# Altium PCB MainBoardPCB_PWR.PcbDoc (part 29 of 29)
Units mm, origin at the board's own origin, x right, y up, seen from the top; angles counter-clockwise.
Board outline 333.63 x 349.38 mm, 16 copper layers (L1, L2 (GND), L3 (Sign), L4 (GND), L5 (Sign), L6 (PWR/GND), L7(PWR/GND), L8 (PWR/GND), L9 (PWR/GND), L10 (PWR/GND), L11 (PWR/GND), L12 (Sign), L13 (GND), L14 (Sign), L15 (GND), L16), stack 2.503 mm thick; 2187 components, 1615 nets, 7987 pads, 1695 vias.
Unrouted connection lines stored in the file: 4757.
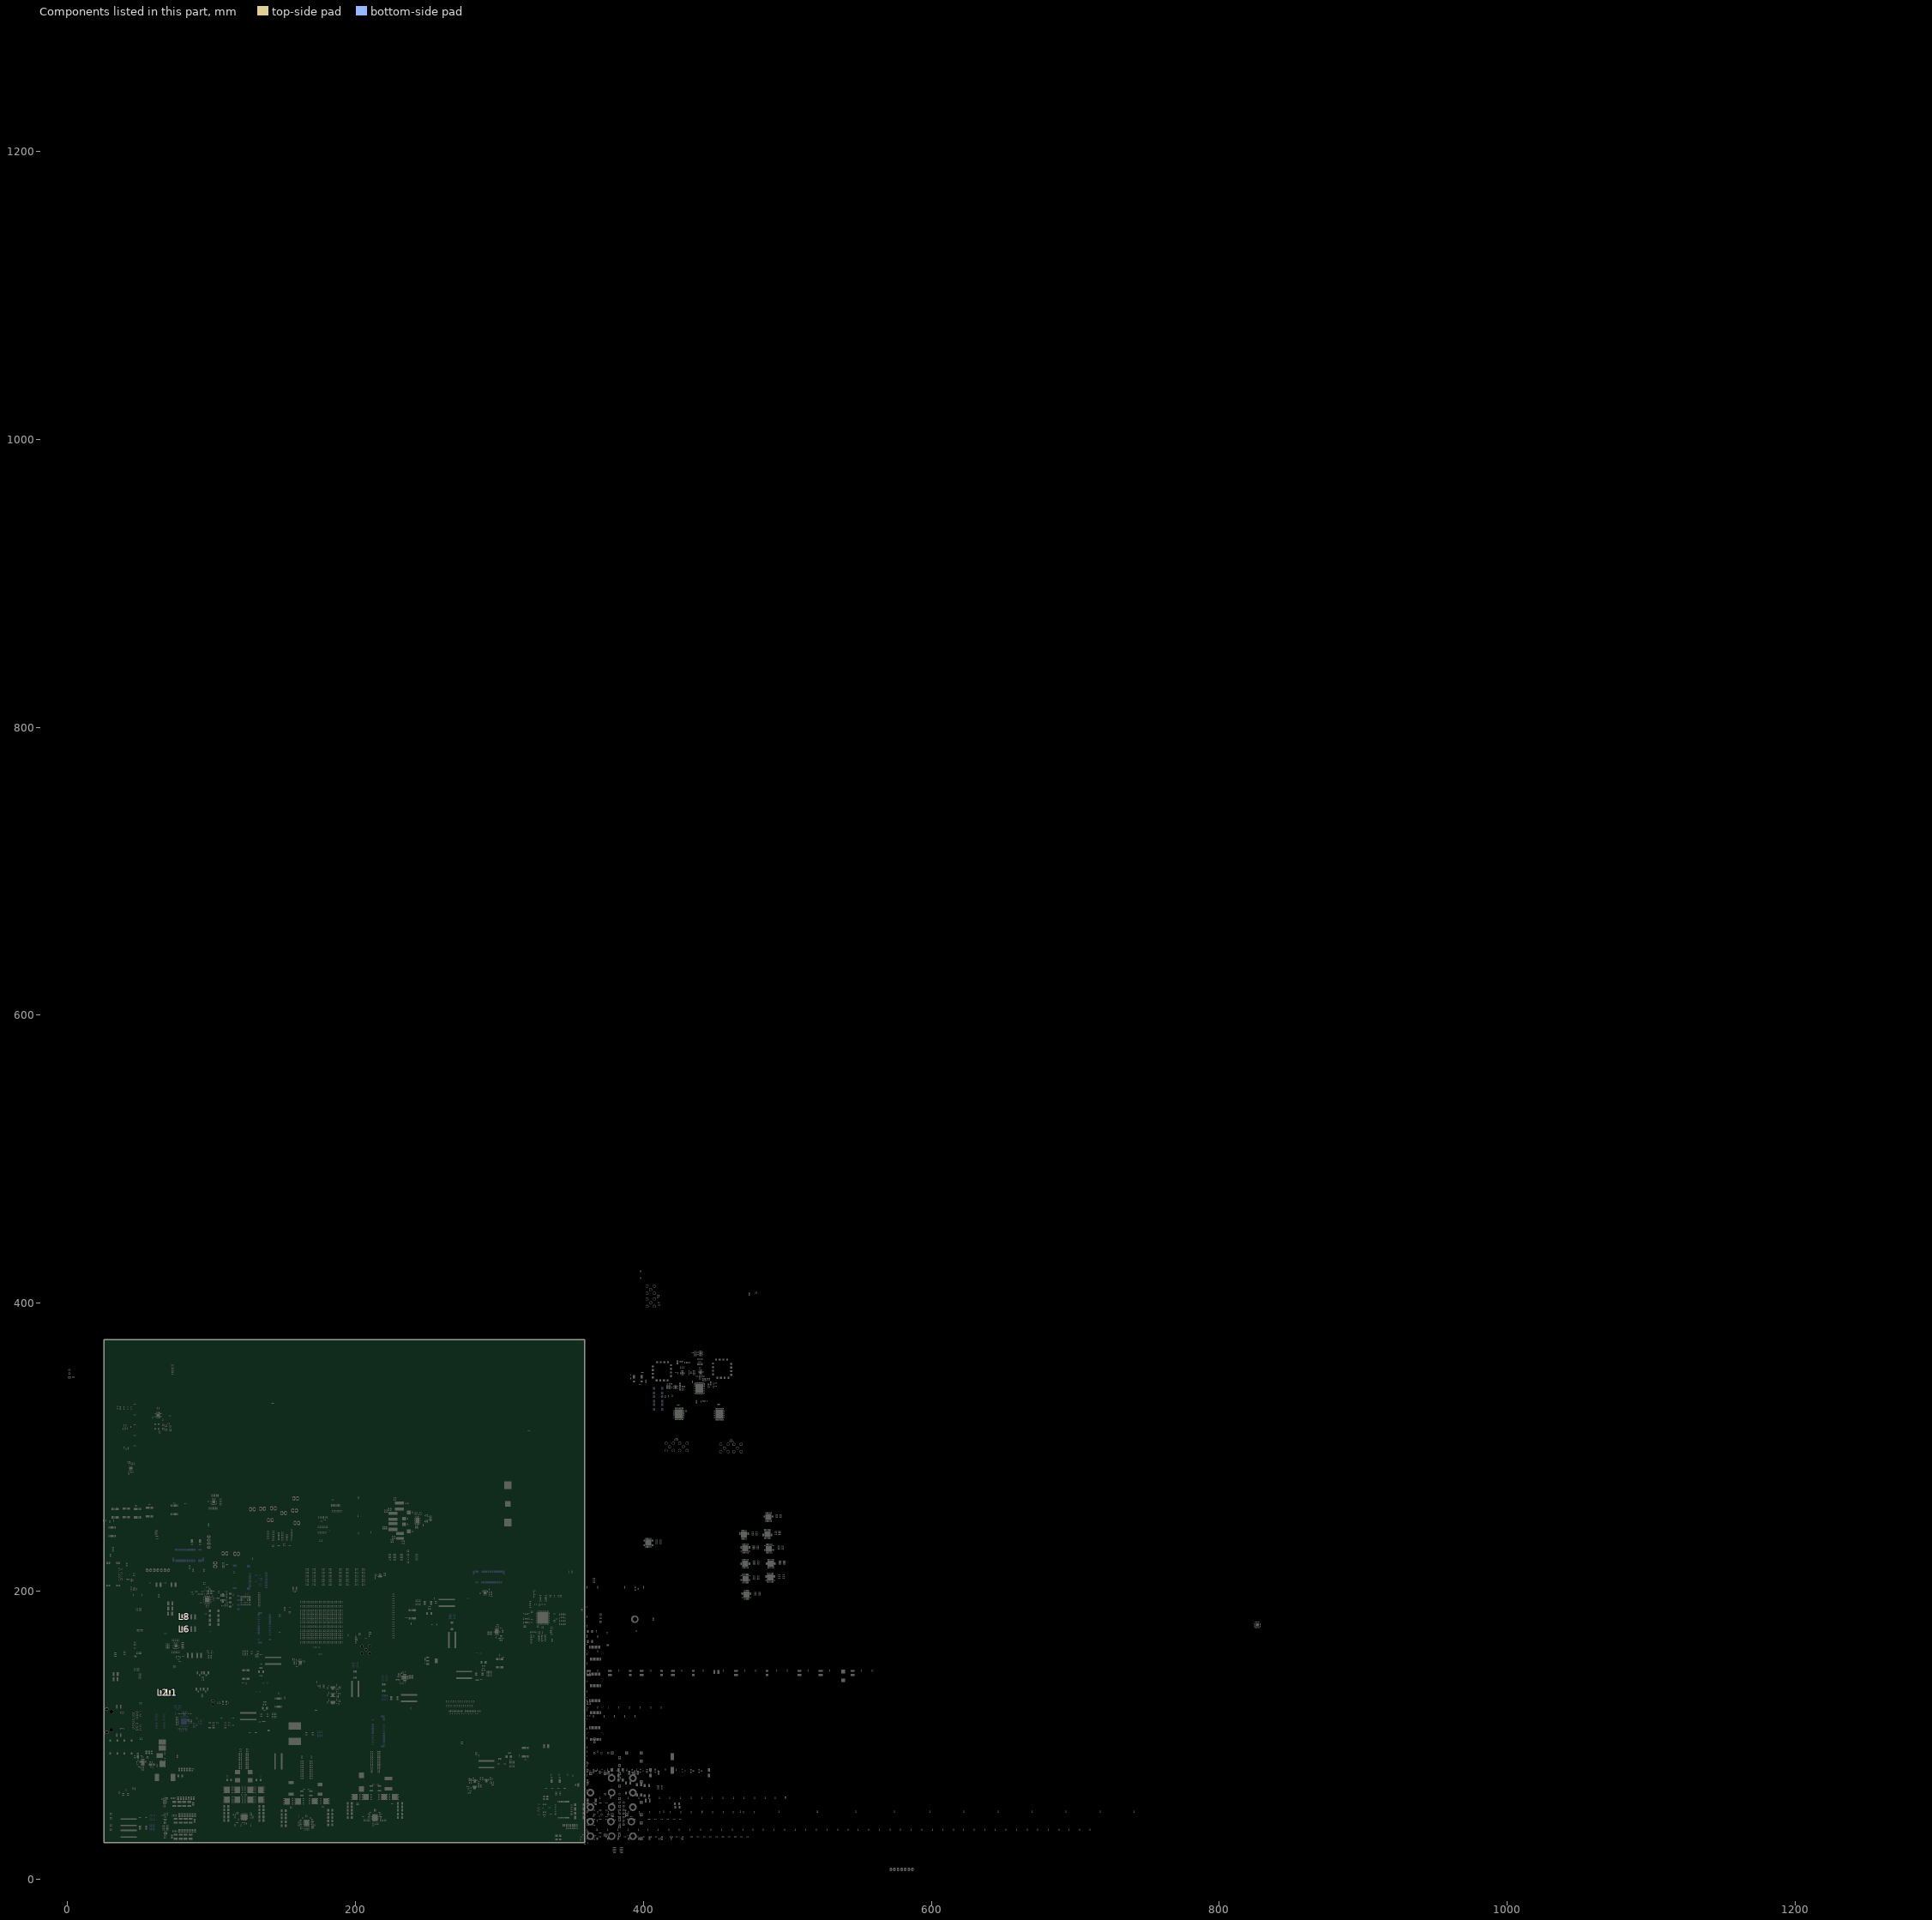
[diagram p24: the components of this part, seen from the top]

## Polygon pours and split planes (outlines as drawn) (continued)
NetD17_2 on L1 "NETD17_2_L01_P076" (solid, remove dead copper, pour order 76): 235.887,250.943 237.571,250.943 238.507,250.007 241.424,250.007 241.424,249.683 240.724,249.683 240.714,249.673 235.887,249.673
NetD18_2 on L1 "NETD18_2_L01_P074" (solid, remove dead copper, pour order 74): 239.187,255.313 239.187,252.923 239.993,252.117 239.993,250.708 241.399,250.708 241.399,251.887 240.724,252.562 240.724,255.313
NetD18_1 on L1 "NETD18_1_L01_P073" (solid, remove dead copper, pour order 73): 234.559,254.669 231.738,254.669 230.427,255.98 230.352,255.98 227.457,255.98 227.457,258.616 235.884,258.616 238.552,255.948 238.552,253.181 239.693,252.04 239.693,250.481 241.377,250.481 241.424,250.433 241.424,250.183 238.912,250.183 235.87,253.225 235.87,253.358
3.3V_Stable_2 on L1 "3.3V_STABLE_2_L01_P068" (solid, remove dead copper, pour order 68): 277.204,59.376 278.954,59.376 278.954,61.24 279.181,61.467 281.697,61.467 281.954,61.725 281.954,63.534 281.879,63.609 279.061,63.609 278.954,63.501 278.954,62.584 277.204,62.584
5V_RAIL on L1 "5V_RAIL_L01_P067" (solid, remove dead copper, pour order 67): 286.481,67.053 286.481,66.157 286.629,66.009 287.736,66.009 287.999,65.746 287.999,64.784 287.899,64.684 284.99,64.684 284.589,64.283 284.589,63.534 283.904,63.534 283.754,63.384 283.754,62.159 283.979,61.934 289.134,61.934 289.134,68.22 289.095,68.259 290.08,68.259 290.131,68.309 290.131,69.809 285.186,69.809 284.832,69.455 284.832,67.984 283.797,67.984 283.797,66.784 284.687,66.784 284.832,66.639 285.072,66.879 285.072,67.053
3.3V_Stable_1 on L1 "3.3V_STABLE_1_L01_P066" (solid, pour order 66): 291.798,69.809 296.994,69.809 296.994,66.96 296.977,66.943 292.766,66.943 292.766,68.909 292.691,68.983 291.822,68.983
Power_3.3_2 on L1 "POWER_3.3_2_L01_P064" (solid, remove dead copper, pour order 64): 227.504,145.003 227.547,144.96 234.325,144.96 234.325,142.049 231.624,139.348 227.504,139.348
3.3V_Stable_3 on L1 "3.3V_STABLE_3_L01_P063" (solid, remove dead copper, pour order 63): 277.738,69.234 279.518,69.234 279.642,69.11 279.642,66.899 277.748,66.899 277.738,66.909 277.738,65.934 281.637,65.934 281.976,66.273 281.976,69.113 282.772,69.909 282.772,70.737 277.738,70.737
FTDI_GND on L1 "FTDI_GND_L01_P062" (solid, remove dead copper, pour order 62): 41.035,290.882 41.074,290.843 47.216,290.843 47.216,288.889 47.216,282.109 44.836,282.109 43.388,280.661 41.014,280.661
FTDI_VccIO on L1 "FTDI_VCCIO_L01_P060" (solid, remove dead copper, pour order 60): 42.576,286.185 42.745,286.354 42.745,290.799 42.798,290.851 47.223,290.851 47.223,288.898 46.967,288.642 44.826,288.642 44.826,287.89 43.276,286.34
FTDI_5V on L1 "FTDI_5V_L01_P059" (solid, remove dead copper, pour order 59): 42.145,284.34 42.145,282.268 44.576,282.268 44.576,284.34 42.254,284.34
1V8@0.5A_ADC_filtered on L1 "1V8@0.5A_ADC_FILTERED_L01_P058" (solid, remove dead copper, pour order 58): 299.809,172.083 299.857,172.131 299.857,173.561 300.043,173.747 300.877,173.747 301.054,173.925 301.054,175.978 300.887,176.145 298.859,176.145 298.709,176.295 298.709,177.348 298.738,177.377 302.695,177.377 304.046,176.025 304.046,172.155 301.827,172.155 301.755,172.083
0V9@1A_REG3 on L1 "0V9@1A_REG3_L01_P057" (solid, remove dead copper, pour order 57): 299.809,171.363 299.817,171.355 301.313,171.355 301.313,168.586 301.053,168.326 301.053,165.034 300.877,164.858 299.915,164.858 299.67,165.103 299.67,166.403 300.104,166.837 300.104,167.468 299.609,167.963 299.609,171.368
ANGD on L1 "ANGD_L01_P055" (solid, remove dead copper, pour order 55): 115.642,37.426 115.589,37.479 115.589,48.586 130.338,48.586 130.34,48.588 130.34,37.426
AGND_2 on L1 "AGND_2_L01_P053" (solid, remove dead copper, pour order 53): 157.199,33.778 157.199,43.499 173.008,43.499 173.008,34.274 171.996,33.262 157.715,33.262
Vout_5V@10A_INA on L1 "VOUT_5V@10A_INA_L01_P049" (solid, remove dead copper, pour order 49): 169.482,63.617 179.17,63.617 179.141,63.646 179.141,89.957 169.468,89.957
Vout1_2 on L1 "VOUT1_2_L01_P048" (solid, remove dead copper, pour order 48): 152.928,69.366 152.928,71.725 ccw(c152.251,71.725) 152.251,72.402 150.843,72.402 cw(c150.843,74.942) 148.303,74.942 148.303,87.517 cw(c150.833,87.517) 150.833,90.047 162.59,90.047 162.59,63.626 162.618,63.597 152.931,63.597
NetC646_2 on L1 "NETC646_2_L01_P045" (solid, remove dead copper, pour order 45): 167.705,60.63 167.686,60.63 167.686,62.708 170.355,62.708 170.355,60.583 167.705,60.583
NetC645_2 on L1 "NETC645_2_L01_P044" (solid, remove dead copper, pour order 44): 161.498,60.63 161.48,60.63 161.48,62.707 164.148,62.707 164.148,60.582 161.498,60.582
NetC568_2 on L1 "NETC568_2_L01_P043" (solid, remove dead copper, pour order 43): 290.07,201.499 292.217,201.499 292.535,201.182 293.335,201.182 293.335,200.21 293.735,199.81 295.235,199.81 295.235,198.46 293.735,198.46 293.735,198.932 293.635,199.031 292.535,199.031 292.535,198.684 292.19,198.339 292.186,198.343 291.09,198.343 291.09,200.081 291.06,200.111 290.07,200.111
ADP1741_3.6V on L1 "ADP1741_3.6V_L01_P042" (solid, remove dead copper, pour order 42): 286.064,198.557 287.63,198.557 287.98,198.206 288.8,198.206 288.99,198.396 288.99,200.081 290.04,200.081 290.07,200.111 290.07,201.499 286.064,201.499
Vout_1_Selector on L1 "VOUT_1_SELECTOR_L01_P041" (solid, remove dead copper, pour order 41): 71.506,50.342 73.252,52.088 74.649,52.088 74.799,52.238 89.845,52.238 89.845,54.95 88.723,56.072 71.493,56.072 68.767,53.347 66.181,53.347 66.181,52.852 69.112,52.895 69.112,52.594 68.967,50.188 68.921,50.086 64.58,45.745 64.58,42.155 67.81,42.155 67.81,42.7 67.66,42.85 66.66,42.845 66.66,43.65 66.181,44.13 66.181,44.75 66.406,44.75 71.493,50.336 71.506,50.324
Battery_PWR on L1 "BATTERY_PWR_L01_P037" (solid, remove dead copper, pour order 37): 68.017,31.762 70.729,31.762 70.729,36.509 70.621,36.617 69.303,36.617 69.303,32.717 69.167,32.582 68.017,32.582
AGND_1 on L1 "AGND_1_L01_P036" (solid, remove dead copper, pour order 36): 205.386,36.611 205.386,45.614 205.745,45.973 221.555,45.973 221.555,36.748 220.984,36.177 205.82,36.177
NetC638_2 on L1 "NETC638_2_L01_P029" (solid, remove dead copper, pour order 29): 215.592,63.946 215.573,63.946 215.573,66.023 218.242,66.023 218.242,63.898 215.592,63.898
NetC637_2 on L1 "NETC637_2_L01_P028" (solid, remove dead copper, pour order 28): 209.72,63.946 209.701,63.946 209.701,66.023 212.37,66.023 212.37,63.898 209.72,63.898
5V_LN on L1 "5V_LN_L01_P022" (solid, remove dead copper, pour order 22): 424.658,343.392 427.76,343.392 427.76,341.142 426.158,341.142 426.158,341.942 424.37,341.942 424.37,342.042 423.155,342.042 423.155,343.392 423.146,343.392
3V3_Rail on L1 "3V3_RAIL_L01_P020" (solid, pour order 20): 291.419,173.273 296.753,173.273 296.753,171.908 296.709,171.863 295.859,171.863 295.859,171.583 296.709,171.583 296.709,170.373 295.595,170.373 295.235,170.733 291.359,170.733 291.349,170.723
PGND on L1 "PGND_L01_P017" (solid, pour order 17): 53.182,82.572 53.182,84.012 54.121,84.951 55.425,84.951 55.425,85.236 56.031,85.842 60.425,85.842 60.881,85.387 60.881,83.335 61.435,82.78 63.03,82.78 63.03,78.798 62.832,78.6 61.725,78.6 60.695,79.629 60.695,80.69 58.401,80.69 58.366,80.655 58.262,80.76 58.262,82.063 57.753,82.572
PGND on L1 "PGND_L01_P015" (solid, remove dead copper, pour order 15): 43.053,88.444 42.903,88.294 37.586,88.294 37.586,86.446 36.583,85.444 32.846,85.444 32.846,90.786 34.583,92.523 72.408,92.523 73.958,90.972 73.958,81.438 86.353,81.438 88.128,79.663 88.128,76.18 72.825,76.18 72.713,76.069 69.447,79.335 69.447,88.717 61.746,88.717 61.185,88.157 47.908,88.157 47.135,87.384 47.135,85.239 42.848,85.239 43.053,85.444
CSP on L1 "CSP_L01_P013" (solid, pour order 13): 71.099,73.536 76.498,73.536 76.498,70.052 74.498,68.052 71.099,68.052
VCCINT on L1 "VCCINT_L01_P012" (solid, remove dead copper, pour order 12): 53.697,82.057 58.157,82.057 58.366,81.848 58.366,80.655 59.054,80.655 59.189,80.52 59.189,78.59 56.386,78.59 56.178,78.798 56.178,80.857 56.069,80.857 55.54,81.386 55.511,81.357 53.697,81.357
Ground_PWR_PoE on L1 "GROUND_PWR_POE_L01_P011" (solid, remove dead copper, pour order 11): 47.633,86.427 51.357,86.427 51.357,85.014 50.944,84.601 50.944,83.691 49.689,82.436 46.798,82.436 46.398,82.036 46.398,80.055 48.424,80.055 48.66,79.82 48.66,77.599 48.816,77.442 53.697,77.442 53.697,76.545 53.447,76.295 47.788,76.295 44.998,79.085 44.998,84.69 45.322,85.014 47.633,85.014
V_PoE+ on L1 "V_POE+_L01_P010" (solid, remove dead copper, pour order 10): 47.768,86.642 52.167,86.642 52.182,86.627 52.182,82.572 52.482,82.572 52.532,82.622 52.532,83.83 52.999,83.83 53.697,84.527 53.697,86.127 60.595,86.127 61.166,85.557 61.166,83.697 62.169,83.697 62.441,83.968 66.172,83.968 66.172,83.993 66.38,84.202 66.38,87.502 61.88,87.502 61.365,88.017 47.768,88.017 47.768,87.029
NetC693_1 on L1 "NETC693_1_L01_P009" (solid, pour order 9): 66.98,87.172 66.982,87.173 69.088,87.173 69.088,76.953 65.672,73.536 65.672,67.995 64.58,66.904 58.928,66.904 58.378,67.454 58.378,77.034 58.928,77.584 63.1,77.584 63.416,77.901 63.416,83.394 63.718,83.697 66.366,83.697 66.616,83.947 66.616,87.129 66.659,87.172 66.98,87.172
NetC581_2 on L1 "NETC581_2_L01_P008" (solid, pour order 8): 416.436,344.927 416.436,343.042 415.636,343.042 415.636,341.692 421.451,341.692 421.505,341.637 421.505,343.032 420.402,343.032 420.257,343.177 418.907,343.177 418.907,344.908 418.889,344.927
0.85V@40A_INA on L1 "0.85V@40A_INA_L01_P007" (solid, pour order 7): 132.007,71.916 124.577,71.916 124.577,75.386 125.138,75.946 125.138,91.327 119.903,91.327 119.903,75.851 120.46,75.294 120.46,71.916 112.916,71.916 112.916,95.221 132.007,95.221
no net on L1 "NONET_L01_P006" (solid, pour order 6): 132.074,71.89
FTDI_GND on L2 (GND) "FTDI_GND_L02_P061" (solid, remove dead copper, pour order 61): 41.042,290.89 41.081,290.851 47.223,290.851 47.223,288.898 47.223,282.118 44.843,282.118 43.395,280.67 41.021,280.67
ANGD on L2 (GND) "ANGD_L02_P056" (solid, remove dead copper, pour order 56): 115.642,37.426 115.589,37.479 115.589,48.586 130.338,48.586 130.34,48.588 130.34,37.426
AGND_2 on L2 (GND) "AGND_2_L02_P054" (solid, remove dead copper, pour order 54): 157.199,33.778 157.199,43.499 173.008,43.499 173.008,34.274 171.996,33.262 157.714,33.262
AGND_1 on L2 (GND) "AGND_1_L02_P035" (solid, remove dead copper, pour order 35): 205.386,45.614 205.745,45.973 221.555,45.973 221.555,36.748 220.984,36.177 205.82,36.177 205.386,36.611
PGND on L2 (GND) "PGND_L02_P019" (solid, remove dead copper, pour order 19): 43.053,88.444 42.903,88.294 37.586,88.294 37.586,86.446 36.583,85.444 32.846,85.444 32.846,90.786 34.583,92.523 34.633,92.472 45.546,92.472 72.421,92.472 73.958,90.935 73.958,81.438 86.353,81.438 88.128,79.663 88.128,76.18 72.825,76.18 72.713,76.069 69.447,79.335 69.447,88.017 69.424,87.994 47.745,87.994 47.135,87.384 47.135,85.239 43.014,85.239 43.053,85.444 43.053,85.601
Ground_PWR_PoE on L2 (GND) "GROUND_PWR_POE_L02_P014" (solid, remove dead copper, pour order 14): 51.357,86.427 51.182,86.252 51.182,82.572 53.482,82.572 53.697,82.357 53.697,76.545 53.447,76.295 47.788,76.295 44.998,79.085 44.998,84.69 45.322,85.014 47.633,85.014 47.633,86.427
V_PoE+ on L8 (PWR/GND) "V_POE+_L08_P100" (solid, remove dead copper, pour order 100): 32.733,92.498 30.373,92.498 ccw(c30.373,89.958) 27.833,89.958 27.833,84.976 ccw(c30.373,84.976) 30.373,82.436 64.243,82.436 ccw(c64.243,84.573) 66.38,84.573 66.38,86.93 ccw(c65.016,86.93) 65.016,88.294 47.934,88.294 cw(c47.934,88.944) 47.284,88.944 47.284,89.983 ccw(c44.744,89.983) 44.744,92.523 32.733,92.523
PWR_OUT_20V on L6 (PWR/GND) "PWR_OUT_20V_L06_P108" (solid, remove dead copper, pour order 108): 66.817,31.612 cw(c66.817,33.433) 65.529,32.145 65.133,32.542 63.463,32.542 ccw(c63.463,31.444) 62.687,32.22 ccw(c63.178,31.73) 62.484,31.73 62.484,29.493 ccw(c63.351,29.493) 62.738,28.88 64.259,27.359 ccw(c66.055,29.155) 66.055,26.615 109.903,26.615 ccw(c109.903,29.155) 111.699,27.359 112.8,28.46 ccw(c111.501,29.76) 113.338,29.76 113.338,36.425 112.023,37.74 ccw(c110.227,35.944) 110.227,38.484 97.181,38.484 ccw(c97.181,36.148) 95.529,37.8 93.896,36.166 cw(c92.099,37.962) 92.099,35.422 74.646,35.422 ccw(c74.646,32.882) 72.85,34.678 70.528,32.356 cw(c68.732,34.152) 68.732,31.612
eMMC_VccQ on L6 (PWR/GND) "EMMC_VCCQ_L06_P114" (solid, remove dead copper, pour order 114): 114.036,190.759 cw(c114.036,190.561) 114.234,190.561 ccw(c114.316,190.561) 114.316,190.479 116.002,190.479 ccw(c116.002,190.855) 116.378,190.855 cw(c116.868,190.855) 116.868,191.344 119.22,191.344 cw(c119.22,190.694) 119.87,190.694 119.87,190.089 cw(c118.775,190.089) 118.775,188.994 117.554,188.994 ccw(c117.554,188.409) 116.968,188.409 cw(c116.754,188.409) 116.754,188.194 111.457,188.194 cw(c111.457,189.309) 110.343,189.309 110.343,190.863 cw(c110.557,190.863) 110.557,191.077 ccw(c110.557,191.212) 110.692,191.212 110.692,194.5 cw(c110.84,194.5) 110.84,194.647 111.65,194.647 cw(c111.65,194.114) 112.184,194.114 112.184,191.329 ccw(c112.754,191.329) 112.754,190.759
Vout_2_Selector on L6 (PWR/GND) "VOUT_2_SELECTOR_L06_P107" (solid, pour order 107): 66.61,41.85 65.732,41.85 ccw(c65.736,40.768) 64.968,41.53 ccw(c65.432,41.15) 64.832,41.15 64.832,32.011 ccw(c65.338,32.517) 65.338,31.801 67.6,31.801 ccw(c67.6,32.178) 67.867,31.912 67.939,31.984 ccw(c67.752,32.172) 68.017,32.172 68.017,32.912 cw(c68.871,32.912) 68.267,33.515 ccw(c67.879,33.904) 68.428,33.904 68.428,38.675 cw(c70.968,38.675) 69.172,40.471 69.255,40.555 89.275,40.555 ccw(c89.275,41.713) 90.094,40.894 90.094,43.488 ccw(c89.245,43.488) 89.845,44.088 ccw(c89.427,43.67) 89.427,44.261 77.066,44.261 ccw(c77.066,43.896) 76.807,44.154 cw(c76.53,44.432) 76.53,44.039 72.492,44.039 ccw(c72.492,41.499) 70.696,43.295 69.419,42.019 cw(c69.01,42.428) 69.01,41.85
Vout_1_Selector on L6 (PWR/GND) "VOUT_1_SELECTOR_L06_P104" (solid, remove dead copper, pour order 104): 66.473,42.136 65.568,42.136 cw(c65.568,44.676) 63.772,42.88 63.737,42.915 cw(c64.416,43.156) 63.695,43.156 63.695,52.595 cw(c64.395,52.595) 64.395,53.295 68.829,53.295 ccw(c68.829,53.601) 69.046,53.385 70.898,55.238 cw(c70.926,55.21) 70.926,55.249 71.56,55.883 cw(c71.883,55.561) 71.883,56.017 87.648,56.017 ccw(c87.648,56.053) 87.673,56.028 88.541,56.028 cw(c88.541,55.405) 88.982,55.845 89.353,55.473 cw(c88.176,54.295) 89.841,54.295 89.841,52.852 cw(c88.359,54.335) 88.359,52.238 74.395,52.238 ccw(c74.395,49.698) 72.599,51.494 67.206,46.101 ccw(c68.958,44.35) 66.48,44.35 66.48,44.084 ccw(c67.095,44.084) 66.66,43.65 ccw(c67.143,44.132) 67.143,43.45 67.198,43.45 cw(c67.198,42.938) 67.56,43.3 cw(c66.961,42.698) 67.81,42.7 cw(c67.013,42.7) 67.577,42.136

## Text inside footprints (layer, text, board x,y; h text height)
BT1: Mechanical 2 "open landscape for no solder resist" at 309.591,250.853 h0.81 r90
C537: Top Overlay "1" at 37.151,207.133 h0.8 r270; Top Overlay "9" at 35.551,206.733 h0.8 r270; Mechanical 1 "Milling Area" at 28.351,215.333 h1.52 r270
P12: Top Overlay "2" at 384.175,34.9 h1.27 r90; Top Overlay "1" at 386.715,34.9 h1.27 r90; Top Overlay "14" at 384.175,55.22 h1.27 r90; Top Overlay "13" at 386.715,55.22 h1.27 r90